# Altium PCB TYPEC_4KRECEIVER-v1.0.PcbDoc (part 6 of 12)
Units mil, origin at the board's own origin, x right, y up, seen from the top; angles counter-clockwise.
Board outline 2834.7 x 1259.84 mil, 10 copper layers (Top Layer, GND-1, Signal L1, GND-2, PWR-1, PWR-2, GND-3, Signal L2, GND-4, Bottom Layer), stack 61.686 mil thick; 492 components, 339 nets, 2214 pads, 1169 vias.
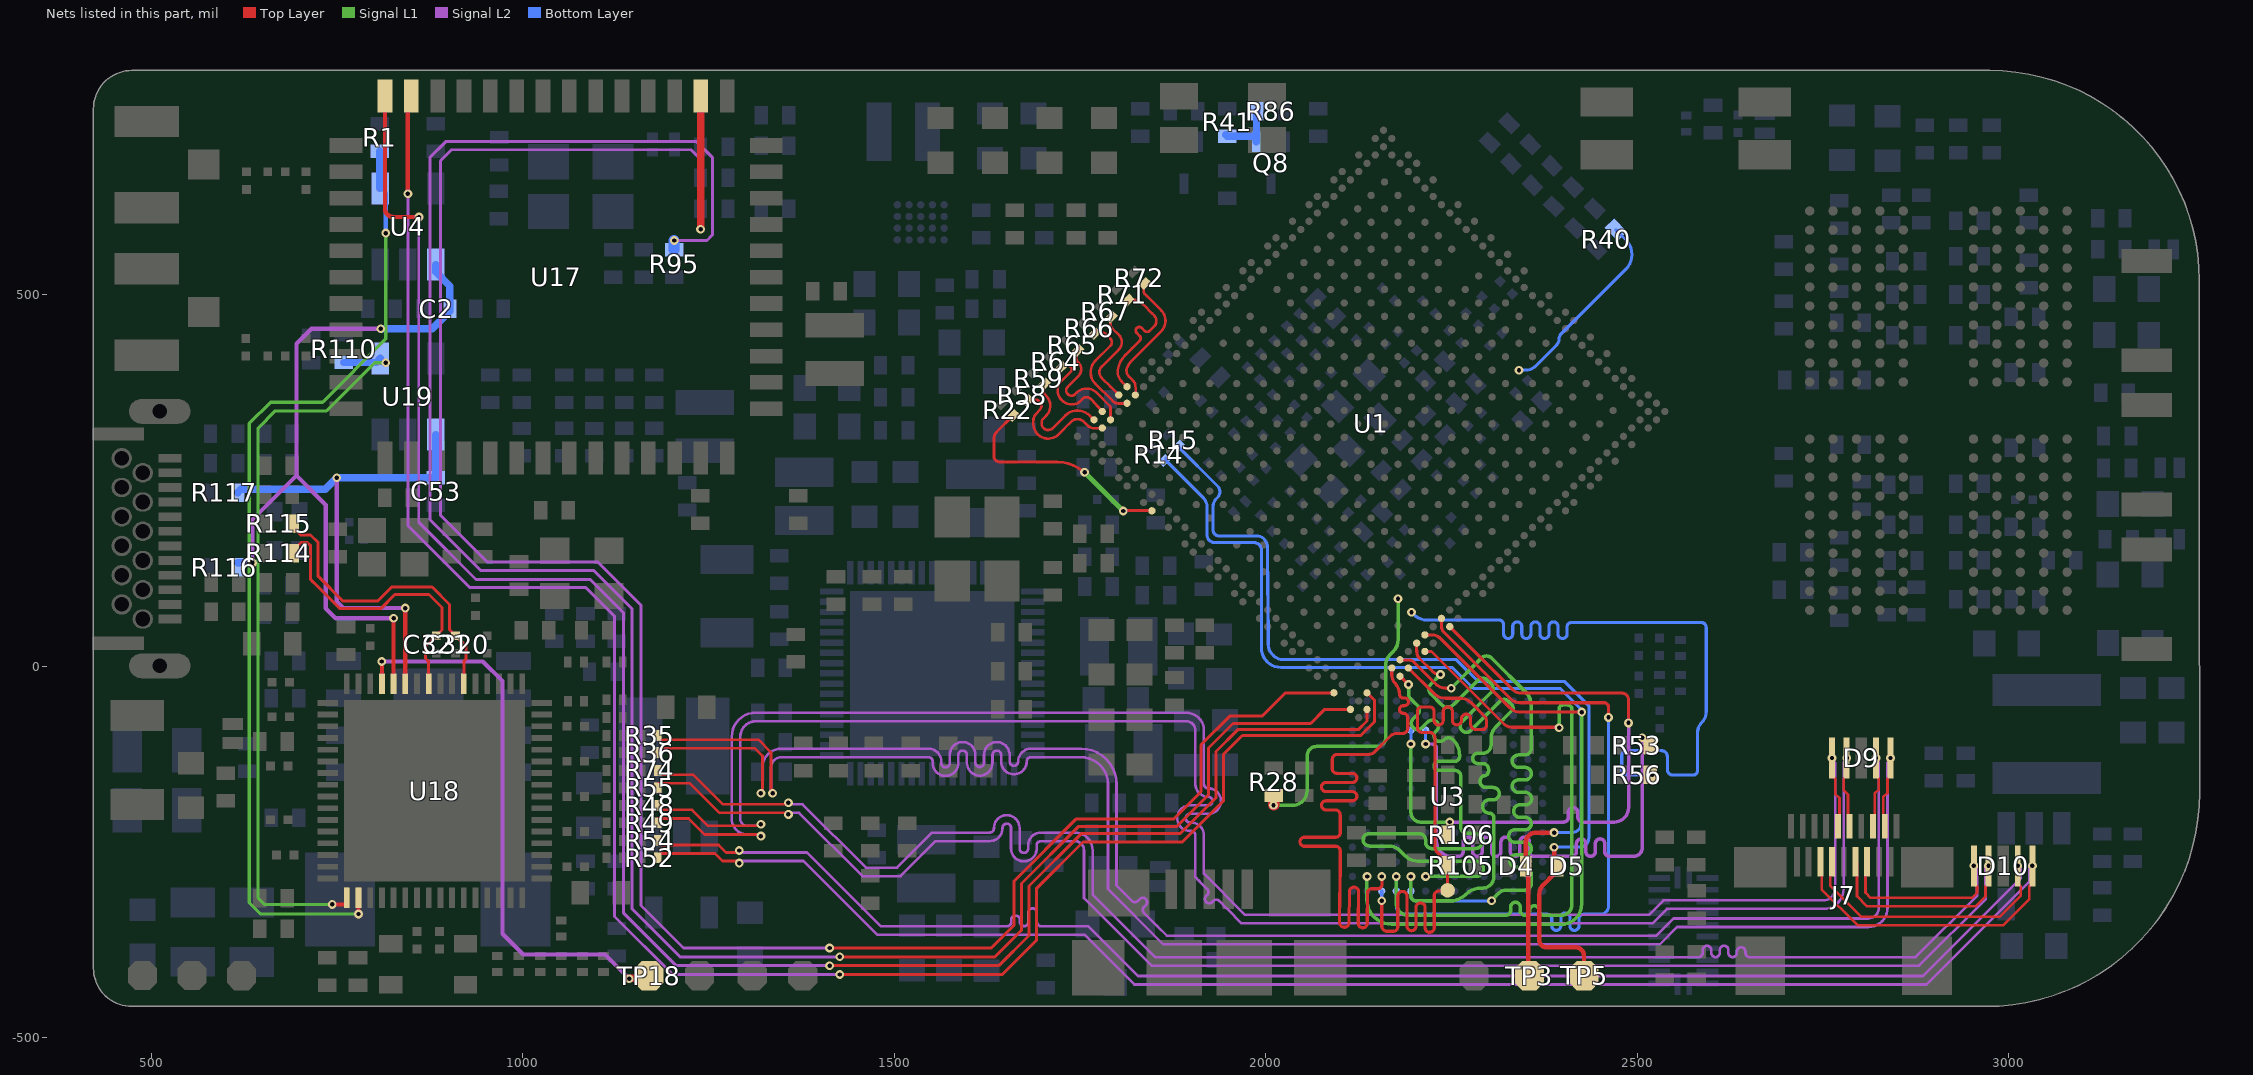
[diagram p11: the nets of this part, all layers, seen from the top]

## Via types
v1: diameter 11.81, hole 5.91, Top Layer to Bottom Layer, tented both sides, 698 vias
v2: diameter 15.75, hole 7.87, Top Layer to Bottom Layer, tented both sides, 248 vias
v3: diameter 11.81, hole 5.91, Top Layer to Signal L1, tented both sides, 121 vias
v4: diameter 11.81, hole 5.91, Top Layer to Bottom Layer, 44 vias
v5: diameter 11.81, hole 5.91, Signal L2 to Bottom Layer, 41 vias
v6: diameter 11.81, hole 5.91, Top Layer to Signal L1, 17 vias

## Nets (pads, with @x,y where several pads share a name; then routed paths per layer and width w, separated by ;. In a path a pad name is that pad's centre, name@x,y a point inside that pad or via, vN(x,y) a via of type N, cw(c..) or ccw(c..) an arc to the next point about the centre after c; other vN are vias at no path point) (continued)
eMMC_DATA2: (continued)
  Signal L1 w4.7: v3(2249.86,-29.98) 2290.57,10.74 cw(c2297.32,4) 2297.34,13.54 cw(c2297.32,3.84) 2304.2,10.68 2304.24,10.64 2350.46,-35.59 ; v1(2304.18,-315.82) 2313.59,-305.8 cw(c2323.14,-314.77) 2323.12,-301.67 ; 2323.16,-301.67 2347.95,-301.67 ccw(c2347.95,-291.79) 2357.84,-291.79 2357.84,-280.19 ccw(c2348.55,-280.19) 2348.55,-270.9 2337.13,-270.9 cw(c2337.13,-262.5) 2337.13,-254.1 2349.26,-254.1 ccw(c2349.26,-245.7) 2349.26,-237.3 2335.36,-237.3 cw(c2335.36,-228.9) 2335.36,-220.5 2349.26,-220.5 ccw(c2349.26,-212.1) 2349.26,-203.7 2342.21,-203.7 cw(c2342.21,-195.3) 2342.21,-186.9 2349.57,-186.9 ccw(c2349.57,-178.5) 2349.57,-170.1 2340.44,-170.1 cw(c2340.44,-161.7) 2340.44,-153.3 2349.31,-153.3 ccw(c2349.31,-144.9) 2349.31,-136.5 2340.44,-136.5 cw(c2340.44,-128.1) 2340.44,-119.7 2349.06,-119.7 ccw(c2349.06,-111.3) 2357.46,-111.3 2357.46,-52.45 ; 2350.5,-35.62 cw(c2333.7,-52.42) 2357.46,-52.4
  Bottom Layer w4.2: U3.A5@2195.64,-302.93 2195.64,-308.92 ccw(c2202.79,-308.92) 2202.79,-316.07 v1@2303.93,-316.07
eMMC_DATA3: U1.B29 U3.B2 | length 865.6
  Top Layer w4.2: U1.B29@2214.43,41.87 2225.72,41.7 cw(c2225.56,30.73) 2233.04,38.76 cw(c2225.56,30.73) 2233.28,38.53 2233.85,38.53 2327.97,-55.59 ccw(c2343.61,-39.93) 2343.61,-62.06 v3(2425.51,-62.06)
  Signal L1 w4.7: v1@2136.32,-283.51 2136.32,-314.24 ccw(c2169.72,-314.24) 2169.72,-347.64 2398.22,-347.64 ccw(c2398.22,-320.35) 2425.51,-320.35 v3@2425.51,-61.94
  other v1: 2136.59,-283.24
eMMC_DATA4: U1.B33 U3.B3 | length 957.9
  Top Layer w4.2: 2096.3,-144.46 cw(c2096.3,-137.34) 2090.39,-141.31 cw(c2093.89,-138.99) 2089.71,-138.63 ccw(c2077.76,-137.48) 2089.76,-137.61 2089.76,-125.45 cw(c2096.21,-125.45) 2096.21,-119 2138.05,-119 ccw(c2138.05,-106.4) 2146.96,-115.31 2168.11,-94.17 cw(c2176.06,-102.09) 2176.06,-90.86 2184.04,-90.86 ccw(c2184.04,-83.5) 2191.41,-83.5 2191.41,-69.72 ccw(c2185.3,-69.72) 2190.82,-67.11 ccw(c2185.3,-69.72) 2185.3,-63.62 cw(c2185.3,-58.52) 2185.3,-53.42 2187.04,-53.42 ccw(c2187.01,-48.18) 2187.09,-42.94 2184.67,-42.94 cw(c2184.67,-38.78) 2183.99,-42.88 cw(c2184.67,-38.78) 2182.05,-42.01 cw(c2184.67,-38.78) 2181.44,-41.4 cw(c2184.67,-38.78) 2180.51,-38.78 ccw(c2154.04,-40.25) 2174.35,-23.21 ccw(c2171.15,-25.94) 2174.16,-23 cw(c2184.91,-12.5) 2169.88,-12.5 U1.B33@2169.88,-2.67 ; 2096.33,-144.46 2116.71,-144.46 cw(c2116.71,-150.61) 2116.71,-156.76 ; 2122.86,-175.21 cw(c2116.71,-175.21) 2116.71,-181.36 ; 2122.86,-150.61 cw(c2116.71,-150.61) 2116.71,-156.76 ; 2136.9,-346.26 cw(c2130.72,-346.18) 2130.62,-352.36 cw(c2130.72,-346.34) 2124.7,-346.26 2125.12,-304.07 2125.13,-303.97 ccw(c2118.91,-303.85) 2112.7,-303.84 2112.7,-303.93 2112.26,-345.66 cw(c2105.96,-345.32) 2099.65,-345.26 2100.49,-263.67 2100.49,-261.03 2100.49,-248.73 ccw(c2094.39,-248.73) 2094.39,-242.63 2052.34,-242.63 cw(c2052.34,-236.53) 2052.34,-230.43 2094.39,-230.43 ccw(c2094.39,-224.33) 2100.49,-224.33 2100.49,-210.03 2100.49,-200.45 ccw(c2093.71,-200.45) 2093.71,-193.66 2081.3,-193.66 cw(c2081.3,-187.51) 2081.3,-181.36 2116.71,-181.36 ; 2136.9,-346.23 2137.34,-304.72 ; 2137.37,-304.7 cw(c2142.2,-304.72) 2142.2,-299.88 2150.71,-299.88 ccw(c2150.71,-293.75) 2156.84,-293.75 2156.84,-283.81 v1(2156.27,-283.24) ; 2116.71,-181.36 ccw(c2116.71,-175.21) 2116.71,-169.06 2081.3,-169.06 cw(c2081.3,-162.91) 2081.3,-156.76 2116.71,-156.76
eMMC_DATA5: U1.A30 U3.B4 | length 862.9
  Top Layer w4.2: U1.A30@2214.43,19.6 2223.29,19.59 2320.97,-78.08 ccw(c2331.57,-67.48) 2331.57,-82.48 2394.52,-82.48 v3(2395.02,-82.98)
  Signal L1 w4.7: 2175.96,-319.66 ccw(c2191.71,-319.66) 2191.71,-335.41 2323.57,-335.41 ccw(c2323.57,-329.06) 2329.92,-329.06 2329.92,-324.39 cw(c2336.27,-324.39) 2342.62,-324.39 2342.62,-329.09 ccw(c2348.97,-329.09) 2355.32,-329.09 cw(c2361.67,-329.06) 2368.02,-329.06 ccw(c2374.37,-329.06) 2374.37,-335.41 2398.35,-335.41 ccw(c2398.35,-321.4) 2412.36,-321.4 2412.36,-58.01 ccw(c2406.82,-58.01) 2406.82,-52.48 2400.04,-52.48 ccw(c2400.04,-57.49) 2395.02,-57.49 v3(2395.02,-82.98) ; 2175.96,-319.62 v1(2175.96,-283.24)
eMMC_DATA6: U1.B30 U3.B5 | length 845.3
  Top Layer w4.2: U1.B30@2203.29,30.73 2203.29,24.78 2203.46,19.26 ccw(c2216.35,19.26) 2207.23,10.15 2224.17,-6.79 ccw(c2235.42,4.47) v3(2235.42,-11.44)
  Signal L1 w4.7: v1(2195.64,-283.24) 2195.64,-309.33 ccw(c2202.38,-309.33) 2202.38,-316.07 2248.66,-316.07 ccw(c2248.66,-286.87) 2269.28,-307.54 ; v3(2235.42,-11.44) 2222.24,-24.62 ccw(c2228.09,-30.49) 2219.8,-30.49 2219.8,-30.98 ccw(c2229.8,-30.98) 2222.73,-38.06 2236.8,-52.12 ccw(c2244.76,-44.23) 2252.85,-51.99 2253.05,-51.78 2285.85,-18.98 cw(c2292.22,-25.37) 2298.34,-18.74 2303.88,-24.29 cw(c2298.33,-29.85) 2304.02,-35.27 2303.97,-35.32 2264.39,-74.89 ccw(c2270.36,-80.81) 2276.3,-86.75 2315.97,-47.08 cw(c2321.09,-52.19) 2326.2,-47.06 2331.46,-52.32 cw(c2327.38,-56.33) 2331.41,-60.38 2310.3,-81.5 ccw(c2326.82,-98.01) 2303.46,-98.01 2303.46,-106.42 cw(c2292.53,-106.42) 2292.53,-117.35 2285.64,-117.35 ccw(c2285.64,-124.32) 2285.64,-131.29 2292.35,-131.29 cw(c2292.35,-138.98) 2300.04,-138.98 2300.04,-141.45 cw(c2293.81,-141.45) 2294.18,-147.67 2293.22,-147.9 ccw(c2294.31,-152.47) 2290.82,-149.32 ccw(c2297.66,-155.34) 2288.55,-155.39 ccw(c2296.63,-155.34) 2296.63,-163.42 2306.03,-163.42 cw(c2306.03,-171.82) 2306.03,-180.22 2301.03,-180.22 ccw(c2301.01,-189.18) 2301.07,-198.15 cw(c2301.07,-204.26) 2307.18,-204.26 2307.18,-283.9 cw(c2292.11,-283.9) 2292.11,-298.97 2289.94,-298.97 ccw(c2289.94,-328.16) 2269.32,-307.5
eMMC_DATA7: U1.A33 U3.B6 | length 840.9
  Top Layer w4.2: U1.A33@2181.02,-13.81 2181.17,-13.82 2192.22,-24.86 v3(2192.37,-24.86)
  Signal L1 w4.7: v3(2192.37,-24.86) 2192.37,-36.56 ccw(c2203.6,-36.53) 2195.68,-44.5 2195.72,-44.54 2200.23,-49.05 2204.73,-53.55 cw(c2199.06,-59.28) 2204.74,-64.99 2198.59,-71.14 ccw(c2204.53,-77.08) 2210.47,-83.02 2218.24,-75.24 cw(c2224.18,-81.18) 2230.12,-87.12 ccw(c2234.59,-93.67) 2240.21,-99.25 cw(c2246.24,-105.29) 2252.27,-99.25 cw(c2230.3,-121.22) 2261.37,-121.17 2261.37,-121.23 cw(c2254.28,-121.22) 2254.28,-128.32 ; v1(2215.33,-283.24) 2283.07,-283.24 ccw(c2283.07,-272.98) 2283.07,-262.71 2204.89,-262.71 cw(c2204.89,-239.35) 2188.37,-255.87 2180.77,-248.27 ccw(c2166.32,-262.72) 2166.32,-242.28 2140.07,-242.28 cw(c2140.07,-233.41) 2131.2,-233.48 2131.2,-233.35 cw(c2138.59,-233.29) 2138.59,-225.9 2207.38,-225.9 cw(c2207.38,-233.85) 2215.33,-233.85 2215.33,-237.3 ccw(c2223.73,-237.3) 2223.73,-245.7 2281.79,-245.7 ccw(c2281.79,-235.44) 2281.79,-225.17 2270.85,-225.17 cw(c2270.85,-217.03) 2262.71,-217.03 2262.71,-148.12 ccw(c2255.21,-148.12) 2255.21,-140.62 2232.81,-140.62 cw(c2232.81,-134.47) 2232.81,-128.32 2254.25,-128.32
eMMC_DATA_STROBE: R56.1 U1.1A16 | length 938.3
  Bottom Layer w4.2: v1(2196.33,72.49) 2199.75,69.07 ccw(c2217.24,86.56) 2217.24,61.82 2314.33,61.82 cw(c2314.33,55.72) 2320.43,55.72 2320.43,43.03 ccw(c2326.53,43.03) 2332.63,43.03 2332.63,53.26 cw(c2338.73,53.26) 2344.83,53.26 2344.83,43.03 ccw(c2350.93,43.03) 2357.03,43.03 2357.03,53.26 cw(c2363.13,53.26) 2369.23,53.26 2369.23,43.03 ccw(c2375.33,43.03) 2381.43,43.03 2381.43,53.26 cw(c2387.53,53.26) 2393.63,53.26 2393.63,43.03 ccw(c2399.73,43.03) 2405.83,43.03 2405.83,52.79 cw(c2411.64,52.79) 2411.64,58.6 2586.42,58.6 cw(c2586.42,51.99) 2593.04,51.99 2593.04,-61.84 cw(c2572.8,-61.84) 2587.11,-76.14 ccw(c2600.8,-89.83) 2581.44,-89.83 2581.44,-140.76 cw(c2575.48,-140.76) 2575.48,-146.72 2547.92,-146.72 cw(c2547.92,-139.6) 2540.8,-139.6 2540.8,-122.13 ccw(c2532.57,-122.13) 2532.57,-113.9 2486.34,-113.9 ccw(c2486.34,-120.89) 2479.35,-120.89 2479.35,-139.26 ccw(c2486.57,-139.26) 2486.57,-146.47 v1(2520.35,-146.47)
eMMC_RSTN: R28.1 U1.1B16 | length 428.3
  Top Layer w10: v3(2010.69,-187.44) v3@2010.94,-187.18 ; R28.1@2010.94,-174.59 R28.1@2011.19,-174.34
  Top Layer w15: v3@2010.94,-187.18 R28.1@2010.94,-174.59
  Signal L1 w4.7: v3(2010.69,-187.44) 2036.17,-187.44 ccw(c2036.17,-167.72) 2055.89,-167.72 2055.89,-121.14 cw(c2068.76,-121.14) 2068.76,-108.27 2149.94,-108.27 ; 2149.99,-108.27 ccw(c2149.99,-96.76) 2161.49,-96.42 2161.48,-96.04 2161.48,0.51 ; 2161.48,0.56 cw(c2181.85,0.52) 2167.47,14.95 2171.52,19 ccw(c2155.16,35.27) 2178.23,35.35 ; 2178.23,35.36 v1(2178.23,90.59)
FLASH_VOL_SEL: R22.2 U1.AF38 | length 307.9
  Top Layer w4: R22.2@1660.47,337.46 1637.94,314.94 ccw(c1646.96,305.89) 1634.19,305.89 1634.19,282.63 ccw(c1642,282.59) 1642.13,274.77 1642.32,274.78 1720.11,274.78 cw(c1720.11,225.16) 1747.3,266.66 v3(1756.36,260.73) ; v3(1808.41,208.62) 1809.09,209.3 1845.21,209.3 1846.56,209.3 U1.AF38@1846.95,208.9
  Signal L1 w7: v3(1756.36,260.73) v3(1808.41,208.62)
G11_STBY_ENB: TP18.1 U18.29 | length 766.2
  Top Layer w5.6: v1(810.49,6.1) 810.53,6.07 U18.29@810.56,-23.78 U18.29@810.56,-23.78
  Top Layer w10: v4(1143.31,-420.79) 1143.66,-420.45 1168.55,-420.45 TP18.1@1170.06,-418.94
  Signal L2 w5.6: v1(810.49,6.1) 946.35,6.1 972.87,-20.41 972.87,-360.33 1000.91,-388.37 1110.89,-388.37 v4(1143.31,-420.79)
G13_VCONN2_EN: R110.2 U18.49 U19.4 | length 1023.6
  Top Layer w5.6: v3(743.89,-320.92) 762.19,-320.92 763.31,-319.8 U18.49@763.32,-311.78
  Signal L1 w4.5: v3(743.89,-320.92) 652.48,-320.92 643.87,-312.31 643.87,320.07 667.09,343.29 736.14,343.29 800.9,408.05 v1(815.82,408.05)
  Bottom Layer w10: R110.2@759.15,408.47 802.72,408.47 U19.4@808.23,413.99
G14_VCONN1_EN: R1.2 U4.4 U18.50 | length 1308.2
  Top Layer w5.6: v3(779.1,-333.75) U18.50@779.09,-311.79
  Signal L1 w4.5: v3(779.1,-333.75) 647.06,-333.75 632.19,-318.88 632.19,326.45 660.9,355.16 730.67,355.16 815.82,440.32 v1(815.82,582.7)
  Bottom Layer w5.6: U4.4@808.23,642.73 cw(c808.23,635.14) 815.82,635.14 v1(815.82,582.7)
  Bottom Layer w10: R1.2@807.76,692.81 807.76,643.2 U4.4@808.23,642.73